# Altium PCB DB42.PcbDoc (part 6 of 8)
Units mil, origin at the board's own origin, x right, y up, seen from the top; angles counter-clockwise.
Board outline 3236.22 x 4456.69 mil, 8 copper layers (Top Layer, MidLayer1, MidLayer2, GND-Layer5, MidLayer3, VCC, MidLayer4, Bottom Layer), stack 62.194 mil thick; 214 components, 470 nets, 1802 pads, 1663 vias.
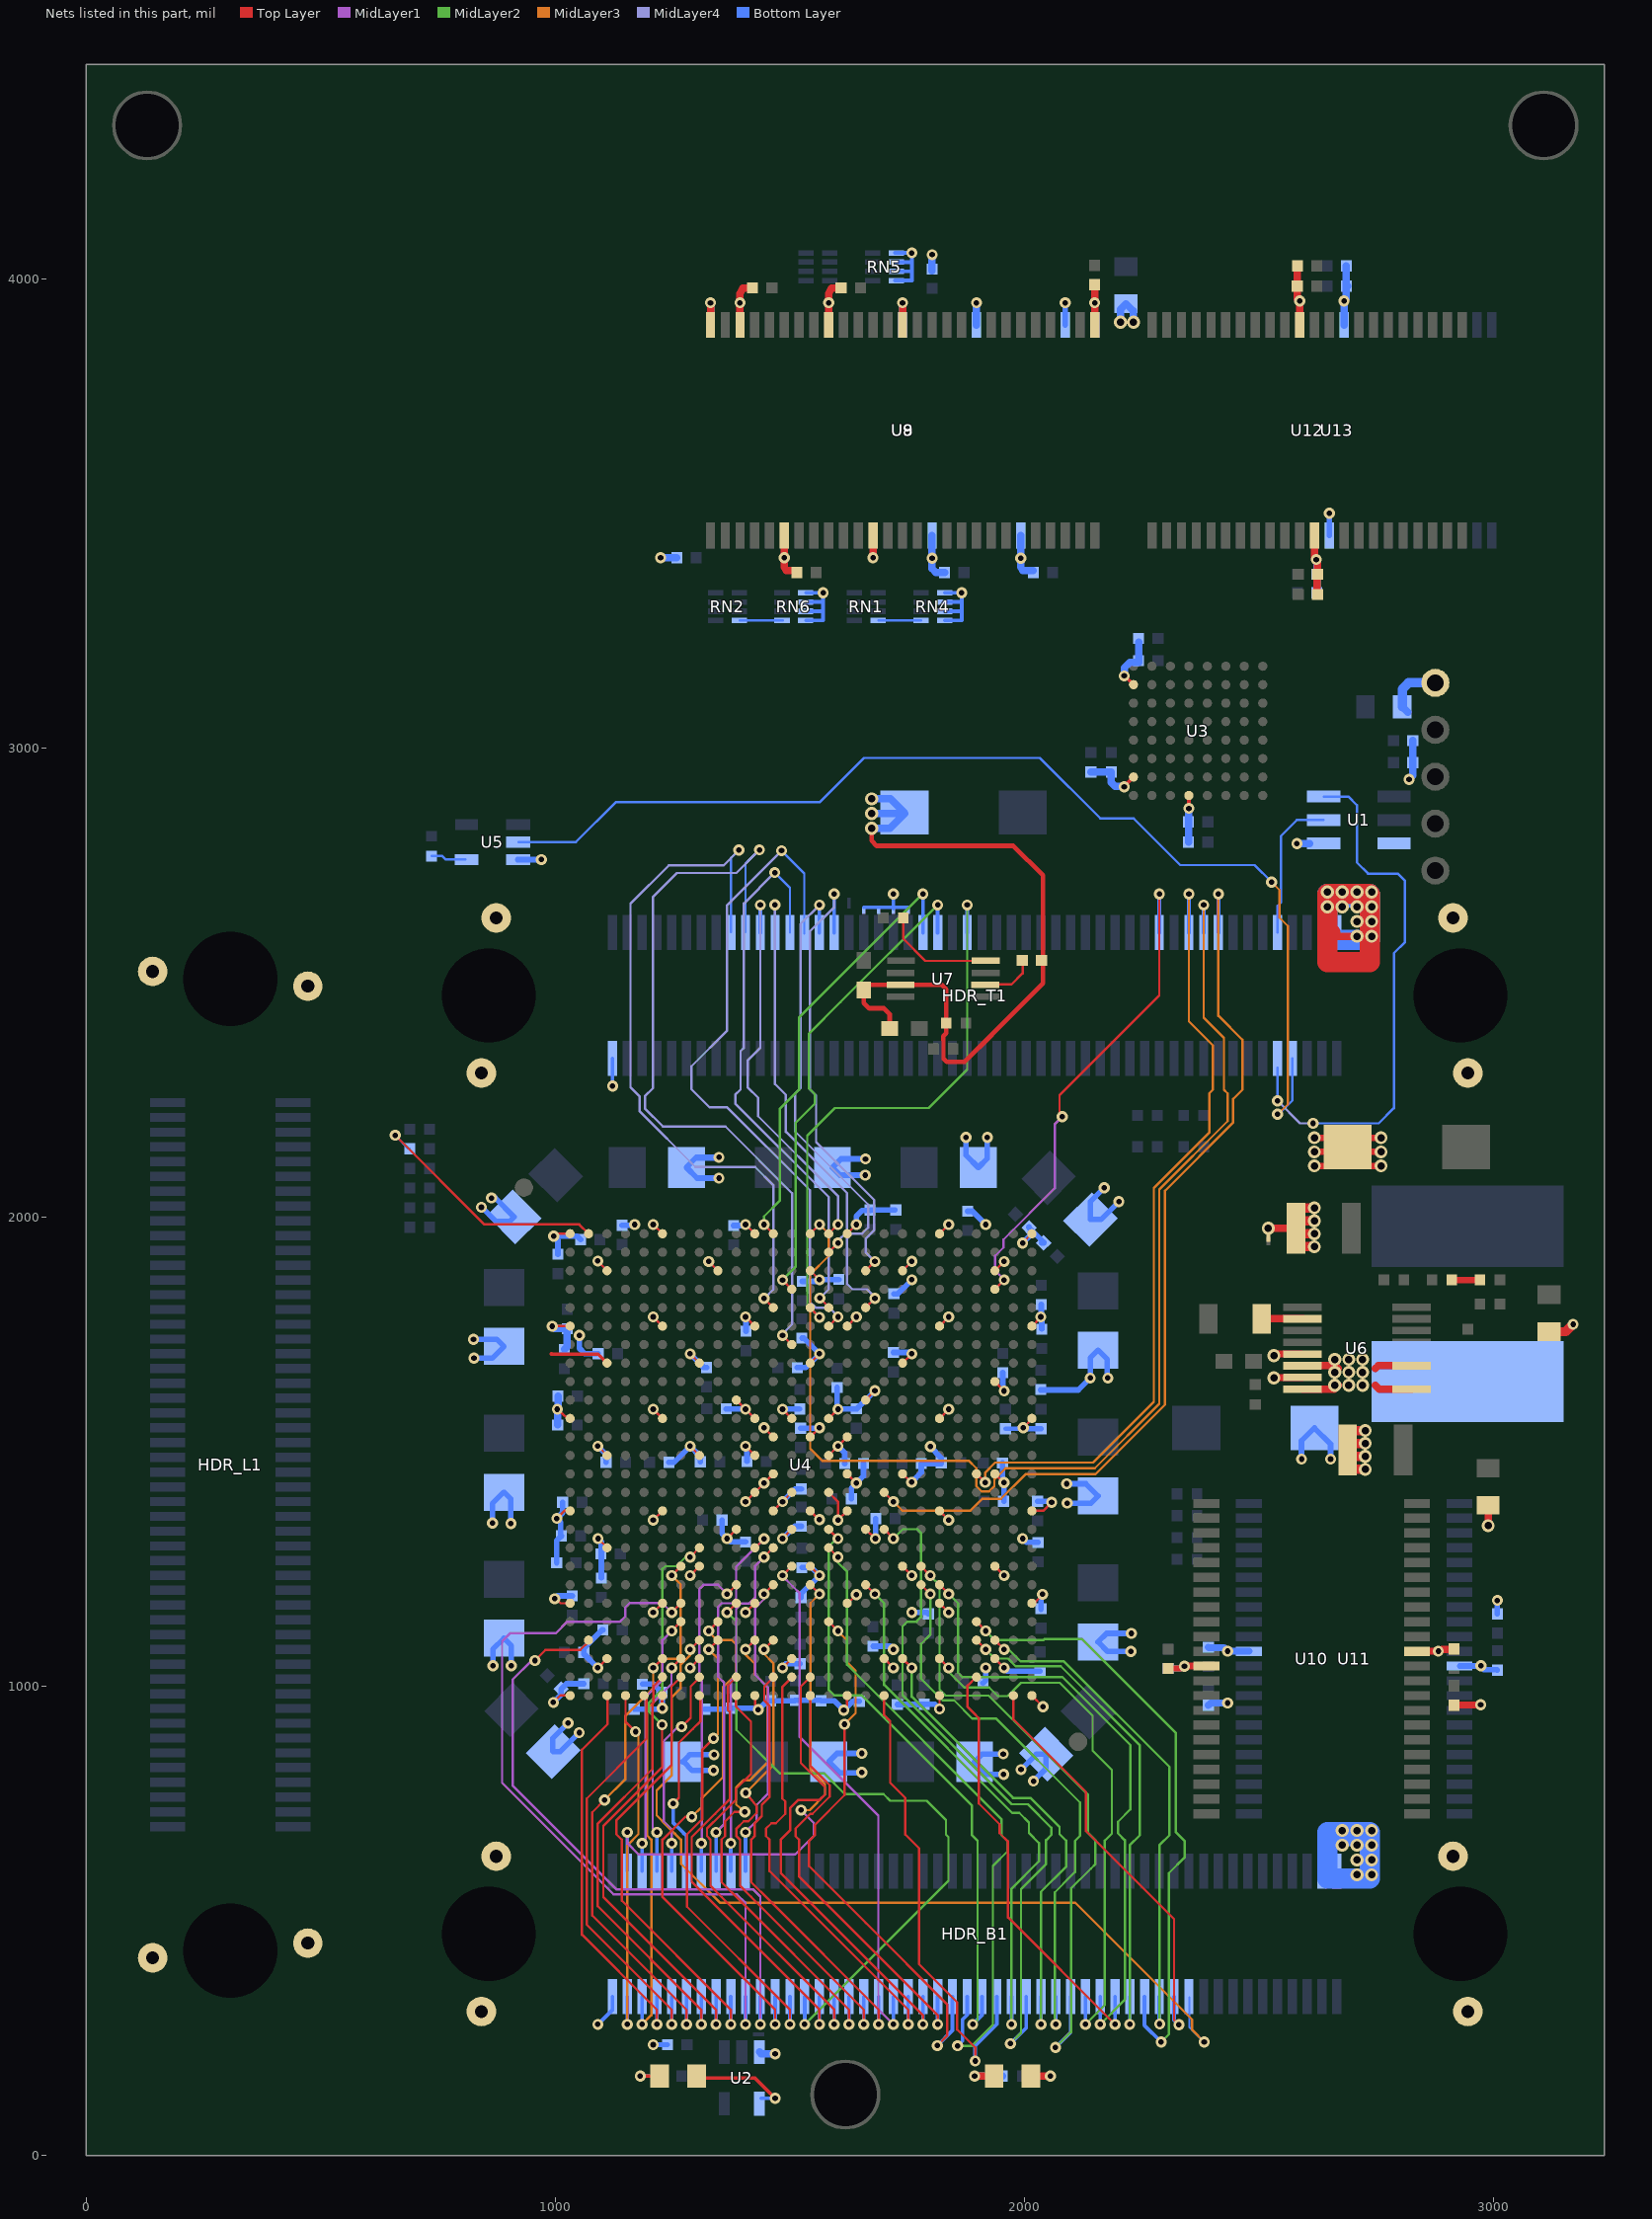
[diagram p12: the nets of this part, all layers, seen from the top]

## Via types
v1: diameter 23.62, hole 11.81, Top Layer to Bottom Layer, 1081 vias
v2: diameter 23.62, hole 11.81, Top Layer to Bottom Layer, tented both sides, 466 vias
v3: diameter 27.56, hole 15.75, Top Layer to Bottom Layer, 116 vias

## Nets (pads, with @x,y where several pads share a name; then routed paths per layer and width w, separated by ;. In a path a pad name is that pad's centre, name@x,y a point inside that pad or via, vN(x,y) a via of type N, cw(c..) or ccw(c..) an arc to the next point about the centre after c; other vN are vias at no path point) (continued)
GND: C1.1 C2.2 C3.2 C4.2 C5.2 C6.2 C7.2 C8.2 C9.2 C10.2 C11.2 C12.2 C13.2 C14.2 C15.2 C16.2 C17.2 C18.2 C19.2 C20.2 C21.2 C22.2 C23.2 C24.2 C25.2 C26.2 C27.2 C28.2 C29.2 C30.2 C31.2 C32.2 C33.2 C34.2 C35.2 C36.2 C37.2 C38.2 C39.2 C40.2 C41.2 C42.2 C43.2 C44.2 C45.2 C46.2 C47.2 C48.2 C49.2 C50.2 C51.2 C52.2 C53.2 C54.2 C55.2 C56.2 C57.2 C58.2 C59.2 C60.2 C61.2 C62.2 C63.2 C64.2 C65.2 C66.2 C67.2 C68.2 C69.2 C70.2 C71.2 C72.2 C73.2 C74.2 C75.2 C76.2 C77.2 C78.2 C79.2 C80.2 C81.2 C82.2 C83.2 C84.2 C85.2 C86.2 C87.2 C88.2 C89.2 C90.2 C91.2 C92.2 C93.2 C94.2 C95.2 C96.2 C97.2 C98.2 C99.2 C100.2 C101.1 C102.2 C103.2 C104.2 C105.2 C106.2 C107.2 C108.2 C109.2 C112.2 C113.2 C114.2 C115.2 C116.2 C118.2 C119.2 C120.2 C121.2 C122.2 C123.2 C124.2 C125.2 C126.2 C127.2 C128.2 C129.2 C130.2 C131.2 C132.2 C133.2 C134.2 C135.2 C136.2 C137.2 C138.2 C139.2 C140.2 C141.2 C142.2 C143.2 C144.2 HDR_B1.1 HDR_B1.98 HDR_B1.100 HDR_B1.MH1 HDR_B1.MH2 HDR_B1.MH3 HDR_B1.MH4 HDR_L1.MH1 HDR_L1.MH2 HDR_L1.MH3 HDR_L1.MH4 HDR_T1.1 HDR_T1.98 HDR_T1.100 HDR_T1.MH1 HDR_T1.MH2 HDR_T1.MH3 HDR_T1.MH4 LED2.2 NT2.2 NT3.2 NT4.2 NT5.2 NT8.2 R25.2 RN4.1 RN4.2 RN4.3 RN4.4 RN5.1 RN5.2 RN5.3 RN5.4 RN6.1 RN6.2 RN6.3 RN6.4 TP1.1 U1.1 U2.3 U3.E8 U3.H2 U3.H7 U4.A1 U4.A6 U4.A11 U4.A16 U4.A21 U4.A26 U4.AA1 U4.AA6 U4.AA11 U4.AA16 U4.AA21 U4.AA26 U4.AD3 U4.AD8 U4.AD13 U4.AD18 U4.AD24 U4.AF1 U4.AF6 U4.AF11 U4.AF16 U4.AF21 U4.AF26 U4.C3 U4.C9 U4.C14 U4.C19 U4.C24 U4.F1 U4.F6 U4.F11 U4.F16 U4.F21 U4.F26 U4.H3 U4.H8 U4.H14 U4.H19 U4.J24 U4.K10 U4.K17 U4.L1 U4.L6 U4.L11 U4.L13 U4.L15 U4.L21 U4.L26 U4.M12 U4.M14 U4.M16 U4.N3 U4.N8 U4.N11 U4.N15 U4.P12 U4.P16 U4.P19 U4.P24 U4.R11 U4.R13 U4.R15 U4.T1 U4.T6 U4.T12 U4.T14 U4.T16 U4.T21 U4.T26 U4.U10 U4.U13 U4.U17 U4.V3 U4.W8 U4.W14 U4.W19 U4.W24 U5.3 U6.13 U6.15 U7.3 U8.6 U8.12 U8.28 U8.41 U8.46 U8.52 U8.54 U9.6 U9.12 U9.28 U9.41 U9.46 U9.52 U9.54 U10.12 U10.34 U11.12 U11.34 U12.12 U12.34 U13.12 U13.34 | length 16704.6
  Top Layer w5: v1(993.19,1767.4) 992.87,1767.72 993.19,1767.72 U4.F1@1031.5,1767.72 ; v1(995.87,965.71) 1011.18,981.02 1031.5,981.02 U4.AF1@1034.8,981.02 ; v1(996.69,1959.45) 1001.81,1964.57 U4.A1@1031.5,1964.57 ; v1@999.29,1189.13 1000.24,1188.18 1011.26,1177.17 U4.AA1@1031.5,1177.17 ; v1(1003.15,1357.87) 1019.29,1374.02 U4.T1@1031.5,1374.02 ; v1(1004.33,1590.55) 1025.31,1571.85 1025.31,1570.87 1025.31,1569.88 U4.L1@1026.3,1570.87 ; v1(1090.55,1039.37) U4.AD3@1110.24,1059.05 ; v1(1090.55,1511.81) U4.N3@1110.24,1492.13 ; v1(1090.59,1906.57) U4.C3@1110.24,1885.83 ; v1(1090.94,1314.96) 1110.24,1295.67 U4.V3@1110.24,1295.28 ; U4.H3@1108.72,1689.87 U4.H3@1109.11,1689.87 ; v1(1208.66,1157.48) U4.AA6@1228.35,1177.17 ; v1(1208.66,1354.33) U4.T6@1228.35,1374.02 ; v1(1208.66,1590.55) U4.L6@1228.35,1570.87 ; v1(1208.66,1787.4) U4.F6@1228.35,1767.72 ; v1(1208.66,1984.25) U4.A6@1228.35,1964.57 ; v1@1226.77,954.33 U4.AF6@1226.77,979.13 ; v1(1227.87,953.54) U4.AF6@1227.87,977.91 ; v1(1287.4,1039.37) U4.AD8@1307.09,1059.05 ; v1(1287.4,1236.22) U4.W8@1307.09,1255.91 ; v1(1287.4,1511.81) U4.N8@1307.09,1492.13 ; v1(1287.4,1708.66) U4.H8@1307.09,1688.98 ; v1(1326.77,1905.51) U4.C9@1346.46,1885.83 ; v1(1366.14,1314.96) U4.U10@1385.83,1334.65 ; U4.K10@1386.61,1610.63 1386.61,1610.24 1386.61,1609.45 v1(1405.51,1590.55) U4.L11@1425.2,1570.87 ; v1(1405.51,1157.48) U4.AA11@1425.2,1177.17 ; v1(1405.51,1393.7) U4.R11@1425.2,1413.39 v1(1444.88,1433.07) U4.P12@1464.57,1452.76 ; v1(1405.51,1511.81) U4.N11@1425.2,1492.13 ; v1(1405.51,1787.4) U4.F11@1425.2,1767.72 ; v1(1405.51,1984.25) U4.A11@1425.2,1964.57 ; U4.AF11@1425.91,979.96 1425.91,957.17 v1(1432.64,950.43) ; v1(1444.88,1551.18) U4.M12@1464.57,1531.5 ; U4.T12@1464.57,1374.02 v1(1484.25,1393.7) U4.R13@1503.94,1413.39 ; v1(1484.25,1039.37) U4.AD13@1503.94,1059.05 ; v1(1484.25,1314.96) U4.U13@1503.94,1334.65 1504.33,1335.04 U4.U13@1505.12,1335.04 ; v1(1484.25,1590.55) U4.L13@1503.94,1570.87 ; U4.W14@1543.31,1255.91 v1(1562.99,1236.22) ; U4.T14@1543.31,1374.02 1562.4,1354.92 v1@1562.99,1354.33 ; U4.M14@1543.31,1531.5 v1(1562.99,1551.18) ; U4.H14@1543.31,1688.98 v1(1562.99,1708.66) ; U4.C14@1543.31,1885.83 1543.7,1885.83 v1(1562.99,1866.54) ; U4.L15@1577.01,1569.88 U4.L15@1580.33,1573.21 ; U4.R15@1582.68,1413.39 1602.36,1393.7 v1(1602.36,1354.33) U4.T16@1622.05,1374.02 ; U4.N15@1582.68,1492.13 v1(1602.36,1511.81) U4.M16@1622.05,1531.5 ; U4.L15@1582.68,1570.87 v1(1602.36,1590.55) ; v1(1614.84,949.37) 1622.05,956.57 U4.AF16@1622.05,980.31 ; U4.AA16@1622.05,1177.17 1623.62,1177.16 v1(1641.73,1195.28) ; U4.P16@1622.05,1452.76 v1(1641.73,1433.07) ; U4.F16@1622.05,1767.72 v1(1641.73,1787.4) ; U4.A16@1622.05,1964.57 v1(1641.73,1984.25) ; U4.U17@1661.42,1334.65 v1(1682.28,1314.96) ; U4.K17@1661.42,1610.24 v1(1681.1,1629.92) ; U4.AD18@1700.79,1059.05 v1(1720.47,1039.37) ; U4.W19@1740.16,1255.91 v1(1759.84,1236.22) ; U4.P19@1740.16,1452.76 v1(1759.45,1435.04) ; U4.H19@1740.16,1688.98 v1(1759.84,1708.66) ; U4.C19@1740.16,1885.83 v1(1759.84,1905.91) ; U4.AF21@1818.9,980.31 1818.9,951.93 v1(1819.09,951.73) ; U4.AA21@1818.9,1177.17 v1(1838.58,1157.48) ; U4.T21@1818.9,1374.02 v1(1838.58,1354.33) ; U4.L21@1818.9,1570.87 v1(1838.58,1590.55) ; U4.F21@1818.9,1767.72 v1(1838.58,1787.4) ; U4.A21@1818.9,1964.57 v1(1838.58,1984.25) ; U4.AD24@1937.01,1059.05 v1(1956.69,1039.37) ; U4.W24@1937.01,1255.91 v1(1956.69,1236.22) ; U4.P24@1937.01,1452.76 1956.1,1434.05 v1@1956.3,1433.86 ; U4.J24@1937.01,1649.61 1937.01,1649.21 v1(1956.69,1629.53) ; U4.C24@1937.01,1885.83 v1(1956.69,1905.51) ; v1@1997.19,1946.36 2015.39,1964.57 U4.A26@2015.75,1964.57 U4.A26@2016.54,1964.57 ; v1(1997.24,1551.18) 2015.75,1569.69 U4.L26@2015.75,1570.87 ; U4.AF26@2015.75,980.31 v1(2039.41,956.65) ; U4.AA26@2015.75,1177.17 2020.47,1177.17 v1@2037.8,1194.49 ; U4.T26@2015.75,1374.02 2039.76,1374.02 v1(2057.87,1392.13) ; U4.F26@2015.75,1767.72 2016.14,1767.72 v1@2032.68,1784.25
  Top Layer w7.87: v1@2212.6,2918.31 U3.H7@2232.28,2937.99 ; v1@2212.6,3154.53 2213.09,3154.04 U3.H2@2232.28,3134.84 ; v1(2350.4,2871.07) U3.E8@2350.39,2898.62
  Top Layer w8: 992.13,1708.66 992.97,1707.82 1091.39,1707.82 U4.H3@1110.24,1688.98 ; 1826.77,2377.95 1827.63,2377.09 1827.63,2337.72 1830.71,2334.65 ; 1875.2,2331.89 1930.31,2387
  Top Layer w10: C119.2@1657.48,2484.25 1657.48,2456.7 1669.29,2444.88 1700.79,2444.88 1712.59,2433.07 C118.2@1712.59,2409.44 ; C119.2@1657.48,2495.07 U7.3@1736.22,2495.07 1823.82,2495.07 1833.15,2485.75 R25.2@1833.15,2413.38 1833.15,2392.2 1826.77,2385.83 1826.77,2377.95 ; v3(1674.21,2828.74) 1674.21,2802.16 1685.04,2791.33 1976.37,2791.33 2039.37,2728.34 2039.37,2547.24 2039.37,2498.03 2016.63,2475.29 ; 1828.68,2336.67 1834.25,2331.1 1872.44,2331.1 2036.41,2495.07
  Top Layer w12: C130.2@2306.5,1038.11 2336.11,1038.11 v1(2341,1043)
  Top Layer w13.78: v3(2618.11,2109.29) C99.2@2669.08,2109.29 ; v3(2618.11,2139.29) C99.2@2669.08,2139.29 ; v3(2618.11,2169.29) C99.2@2669.08,2169.29 ; C99.2@2709.01,2109.29 v3(2759.99,2109.29) ; C99.2@2709.01,2139.29 v3(2759.99,2139.29) ; C99.2@2709.01,2169.29 v3(2759.99,2169.29)
  Top Layer w15: v1@2341,1041.79 v1(2341,1043) 2341.3,1043.3 U10.34@2387.89,1043.3 ; v3(2531.5,1657.48) 2532.26,1658.25 U6.15@2591.08,1658.25 ; v3(2531.5,1704.72) 2535.43,1708.66 U6.13@2590.55,1708.66 ; U10.12@2836.71,1074.8 2881.8,1074.8 v1(2882,1075) 2886.02,1075 2889.76,1078.74 2914.47,1078.74 C129.2@2915.44,1079.71 ; C131.2@2915.31,957.92 2917.32,957.76 C131.2@2915.44,959.64 2914.45,960.63 2915.44,960.63 v1(2972.44,960.63)
  Top Layer w15.75: U8.54@1330.71,3901.57 v2(1330.71,3948.82) ; U8.52@1393.7,3901.57 v2(1393.7,3948.82) ; v2@1393.7,3944.88 v2(1393.7,3948.82) ; 1393.7,3964.57 v2(1393.7,3948.82) ; 1393.7,3968.51 1399.61,3980.32 C125.2@1416.34,3980.32 ; C125.2@1418.31,3978.34 C125.2@1416.34,3980.32 ; C125.2@1420.27,3980.31 C125.2@1416.34,3980.32 ; U8.6@1488.19,3452.76 1488.19,3409.45 v2(1488.19,3405.51) 1488.19,3385.83 1492.13,3377.95 C122.2@1514.76,3377.95 ; U8.46@1582.68,3901.57 v2(1582.68,3948.82) ; v2@1582.68,3944.88 v2(1582.68,3948.82) ; C126.2@1609.25,3980.31 1588.58,3980.32 1582.68,3968.51 1582.68,3964.57 v2(1582.68,3948.82) ; v2(1677.17,3405.51) U8.12@1677.17,3452.76 ; U8.41@1740.16,3901.57 v2(1740.16,3948.82) ; LED2.2@2011.81,169.29 LED2.2@2013.78,169.29 v1(2055.12,169.29) ; U8.28@2149.61,3901.57 v2(2149.61,3948.82) C121.2@2149.6,3987.2 ; v3(2519.68,1976.38) 2578.74,1976.38 C116.2@2582.67,1976.38 ; C138.2@2580.43,4028.54 C138.2@2580.57,4028.67 ; C138.2@2581.69,4027.55 2581.69,3984.24 2581.69,3957.68 v2(2586.61,3952.76) U12.34@2586.61,3901.57 ; U12.12@2618.11,3452.76 2618.11,3405.51 v2(2622.05,3401.57) 2624.72,3398.9 C141.2@2624.72,3370.07 C141.2@2625.71,3371.06 ; C137.2@2623.74,3329.72 2623.74,3370.07 C141.2@2623.77,3370.23 ; 2645.67,2598.43 v3(2708.66,2598.43) ; v3(2988.19,1342.52) C113.2@2988.18,1385.82
  Top Layer w19.68: C115.2@3118.1,1755.9 3153.54,1755.9 v1(3169.29,1771.65)
  Top Layer w20: C116.2@2578.74,1937 v3(2618.1,1937) ; C116.2@2578.74,1964.56 v3(2618.1,1964.56) ; C116.2@2578.74,1992.12 v3(2618.1,1992.12) ; C116.2@2578.74,2019.68 v3(2618.1,2019.68) ; C114.2@2687.01,1462.59 2688.97,1462.59 v3(2726.38,1462.59) ; C114.2@2687.01,1490.15 2688.97,1490.15 v3(2726.38,1490.15) ; C114.2@2687.01,1517.71 2688.97,1517.71 v3(2726.38,1517.71) ; C114.2@2687.01,1545.27 2688.97,1545.27 v3(2726.38,1545.27)
  Top Layer w39.37: 2645.67,2606.3 2653.54,2606.3
  Top Layer w43.31: 2645.67,2543.31 2736.22,2543.31 2736.22,2598.43 2736.22,2629.92 2736.22,2661.42 2736.22,2688.98 2708.66,2688.98 2677.17,2688.98 2645.67,2688.98 v3(2645.67,2661.42) 2645.67,2606.3 2645.67,2598.43 2645.67,2543.31
  Bottom Layer w5: v1@1003.15,1350.39 v1(1003.15,1357.87) ; v1@1223.23,958.66 1227.56,954.33 1228.11,953.78 v1@1228.74,953.15
  Bottom Layer w7.87: v2(1090.55,279.53) 1122.05,311.02 HDR_B1.1@1122.05,338.58 ; v2(1122.05,2279.53) HDR_T1.1@1122.05,2338.58 ; RN6.4@1534.64,3271.65 1570.87,3271.65 1570.87,3291.34 ; RN6.3@1534.64,3291.34 1570.87,3291.34 ; RN6.2@1534.64,3311.02 1570.87,3311.02 ; RN6.1@1534.64,3330.71 v1(1570.87,3330.71) 1570.87,3311.02 ; NT5.2@1657.48,2660.43 1688.97,2660.43 NT3.2@1720.47,2660.43 ; NT3.2@1720.47,2657.48 NT3.2@1720.47,2660.43 ; v2(1720.47,2688.98) NT3.2@1720.47,2660.43 ; RN5.4@1723.62,3996.06 RN5.4@1726.58,3996.06 1759.84,3996.06 1759.84,4015.75 ; RN5.3@1723.62,4015.75 RN5.3@1726.58,4015.75 1759.84,4015.75 ; RN5.2@1723.62,4035.43 RN5.2@1726.58,4035.43 1759.84,4035.43 ; RN5.1@1723.62,4055.12 RN5.1@1726.58,4055.12 v1(1759.84,4055.12) 1759.84,4035.43 ; NT2.2@1751.96,2660.43 NT3.2@1720.47,2660.43 ; RN4.4@1829.93,3271.65 1866.14,3271.65 1866.14,3291.34 ; RN4.3@1829.93,3291.33 1866.14,3291.34 ; RN4.2@1829.93,3311.02 1866.14,3311.02 ; RN4.1@1829.93,3330.7 v1(1866.14,3330.71) 1866.14,3311.02 ; 1570.87,3291.34 1570.87,3311.02 ; 1759.84,4015.75 1759.84,4035.43 ; 1866.14,3291.34 1866.14,3311.02
  Bottom Layer w9.84: v1(1208.66,236.22) C101.1@1239.17,236.22
  Bottom Layer w10: C75.2@1959.65,1549.21 1994.88,1549.21 v1@1996.06,1550.39
  Bottom Layer w11.81: v1(825.58,1739.71) 875.11,1739.71 C10.2@890.44,1724.38 865.43,1699.37 v1(826.56,1699.37) ; v1(865.92,1348.08) 865.92,1389.41 889.95,1413.44 C42.2@890.44,1413.44 891.09,1413.44 905.28,1399.25 v1(905.28,1347.1) ; v1(866.9,1044.02) 866.9,1078.91 C8.2@890.44,1102.45 906.26,1086.63 v1(906.26,1044.02) ; C20.2@994.82,861.98 994.82,889.54 v1(1027.3,922.01) ; C20.2@995.54,860.94 1010.51,860.94 v1(1050.91,901.34) ; v1(1004.33,1590.55) v1@1004.92,1591.14 ; v1(1090.55,1511.81) 1108.27,1494.09 C44.2@1108.27,1477.36 ; v1@1227.56,954.33 C66.2@1227.56,986.61 ; C46.2@1242.13,1477.36 1252.95,1477.36 v1(1287.4,1511.81) 1309.06,1490.16 C30.2@1309.06,1478.35 ; C9.2@1271.74,839.26 C9.2@1272.59,840.11 ; v1(1337.26,820.66) 1292.05,820.66 C9.2@1272.59,840.11 ; v1(1338.24,854.11) 1286.59,854.11 C9.2@1272.59,840.11 ; C71.2@1355.31,1354.33 1355.31,1325.79 v1(1366.14,1314.96) 1373.42,1307.68 C49.2@1405.51,1307.68 ; C77.2@1364.17,1591.54 1404.53,1591.54 v1(1405.51,1590.55) ; v1@1405.12,1512.99 1405.9,1512.21 v1@1406.5,1511.61 ; v1(1405.51,1511.81) 1408.46,1508.86 C17.2@1408.46,1479.33 ; v1(1405.51,1787.4) 1406.5,1786.42 C78.2@1406.5,1756.89 ; v1@1483.07,1039.76 1483.46,1040.16 1491.54,1048.23 C52.2@1521.65,1048.23 ; v1(1484.25,1393.7) v1@1485.24,1394.68 ; C45.2@1515.75,1679.13 1533.46,1679.13 v1(1562.99,1708.66) 1529.53,1742.13 C51.2@1525.59,1742.13 ; C15.2@1522.64,1550.2 1562.01,1550.2 v1(1562.99,1551.18) ; C53.2@1523.62,1188.98 1523.62,1196.85 v1(1562.99,1236.22) 1546.26,1252.95 C27.2@1525.59,1252.95 ; v1@1559.65,1863.19 v1(1562.99,1866.54) v1@1563.58,1867.13 ; v1@1599.41,1508.86 v1(1602.36,1511.81) ; C70.2@1600.39,1636.81 1600.39,1594.09 v1@1602.95,1591.54 ; v1@1601.57,1590.16 1602.17,1590.75 v1@1602.95,1591.54 ; v1@1603.15,1591.34 v1@1602.95,1591.54 ; C12.2@1630.91,1399.61 1630.91,1422.24 v1(1641.73,1433.07) ; v1(1641.73,1984.25) 1641.73,2001.88 1654.1,2014.25 1669.84,2014.25 C96.2@1670.83,2015.24 ; v1(1653.12,816.72) 1652.14,815.74 1606.25,815.74 C39.2@1582.72,839.26 1600.52,857.06 v1(1653.12,857.06) ; v1(1681.1,1629.92) 1642.72,1591.54 C18.2@1641.73,1591.54 v1@1602.95,1591.54 ; v1(1682.28,1314.96) 1683.07,1316.93 C76.2@1683.07,1357.28 ; C86.2@1786.42,961.61 1809.21,961.61 v1(1819.09,951.73) ; v1(1799.61,1511.02) 1822.83,1486.61 C50.2@1822.83,1476.38 ; v1(1875.5,2169.72) 1875.5,2131.76 C5.2@1901.55,2105.71 1920.77,2124.93 v1(1920.77,2169.72) ; v1(1954.72,855.91) 1910.31,855.91 C7.2@1893.67,839.26 1920.34,812.6 v1(1955.51,812.6) ; v1@1955.82,1432.98 1956.6,1432.19 1956.6,1394.33 C28.2@1956.6,1393.97 ; v1(1956.3,1434.25) v1@1958.07,1436.02 ; v1(1992.6,822.62) 2025.35,855.37 C19.2@2046.14,855.37 2046.14,825 v1(2019.17,798.02) ; v1@1998.03,1549.61 1998.42,1549.21 C67.2@2035.43,1549.21 ; v1@2034.25,1788.98 2034.45,1788.78 v1@2034.45,1787.4 ; C89.2@2035.43,1164.37 C89.2@2035.43,1165.35 2035.43,1192.13 v1@2038.58,1195.28 ; v1@2038.19,1197.64 2039.07,1196.75 v1@2042.52,1193.31 ; U9.52@2086.61,3901.57 v2(2086.61,3948.82) ; v1(2090.02,1431.72) 2130.74,1431.72 C40.2@2156.9,1405.56 2141.73,1390.39 v1(2091,1390.39) ; v1(2140.2,1657.06) 2140.2,1699.84 C3.2@2156.88,1716.52 2176.61,1696.79 v1@2176.61,1658.04 ; U9.54@2149.61,3901.57 v2(2149.61,3948.82) ; v1(2169.72,2062.46) 2140.79,2033.53 C21.2@2140.79,1994.88 2163.14,1994.88 v1(2201.21,2032.94) ; v1(2226.79,1074.53) 2176.94,1074.53 C4.2@2156.9,1094.57 2175.23,1112.9 v1(2227.78,1112.9) ; U13.12@2649.61,3452.76 v2(2649.61,3500) ; U11.34@2927.25,1043.3 v1@2972.3,1043.3 ; v1(2973,1044) v1@2972.3,1043.3 ; C136.2@3007.87,1034.44 3006.88,1035.43 2979.33,1035.43 2972.3,1042.47 v1@2972.3,1043.3 ; C134.2@3007.87,1154.52 v1(3007.87,1183.07)
  Bottom Layer w12: v2(842.3,2021.14) 843.29,2021.14 873.79,1990.63 902.21,1990.63 C22.2@912.02,2000.45 871.65,2040.82 v2(863.95,2040.82) ; U5.3@920.04,2762.09 v1(970.22,2762.09) ; v1(995.87,965.71) 1012.39,982.23 C35.2@1012.39,993.98 1024.05,1005.65 C92.2@1060.75,1005.65 ; v1(998.79,1186.73) 1004.68,1192.61 C60.2@1036.15,1192.61 ; C98.2@1002.69,1263.46 1002.69,1310.76 C57.2@1012.8,1320.87 C57.2@1013.51,1320.15 ; C65.2@1005.65,1920.77 1005.65,1950.49 v1(996.69,1959.45) 1046.67,1959.45 C14.2@1053.86,1952.26 ; C57.2@1011.79,1320.29 1011.4,1320.69 1011.4,1320.87 1011.4,1349.63 v1(1003.15,1357.87) 1015.48,1370.21 C69.2@1015.48,1392.36 ; v1(1051.18,1748.03) 1051.18,1720.47 1062.45,1709.21 C94.2@1091.25,1709.21 C94.2@1089.77,1709.21 ; v1(1090.55,1039.37) 1060.76,1069.16 C83.2@1060.76,1072.56 1060.76,1081.21 1099.63,1120.08 C25.2@1101.38,1120.08 ; v1(1090.94,1314.96) 1098.14,1307.76 1098.14,1282.15 C73.2@1098.14,1230.99 ; C63.2@1142.42,1982.77 v1@1166.04,1982.76 ; C32.2@1168.01,951.53 1224.76,951.53 1227.32,954.09 v1@1227.56,954.33 ; C84.2@1185.73,1004.66 1209.51,1004.66 C66.2@1226.97,987.2 C66.2@1227.56,986.61 ; v1(1287.4,1708.66) 1316.37,1679.69 C48.2@1322.5,1679.69 ; C91.2@1318.56,951.52 1372.68,951.52 C90.2@1374.65,953.49 1429.58,953.49 v1(1432.64,950.43) 1451.44,969.23 C47.2@1459.27,969.23 1510.44,969.23 C82.2@1511.42,970.22 1565.54,970.22 C61.2@1566.53,969.23 1594.98,969.23 v1(1614.84,949.37) 1633.72,968.25 C80.2@1648.2,968.25 ; v1(1348.82,2083.07) 1302.26,2083.07 C6.2@1279.61,2105.72 1279.62,2106.39 C6.2@1299.21,2125.98 ; C97.2@1379.92,1982.28 1403.54,1982.28 v1(1405.51,1984.25) ; v1(1484.25,1314.96) 1510.48,1341.19 C16.2@1524.22,1341.19 ; v1(1484.25,1393.7) 1511.44,1420.89 C13.2@1524.22,1420.89 ; v1(1484.25,1590.55) 1484.83,1591.13 C37.2@1520.28,1591.13 ; C79.2@1526.57,1863.19 1559.65,1863.19 v1(1562.99,1866.54) ; v1@1562.99,1866.14 v1(1562.99,1866.54) ; v1(1602.36,1511.81) 1616.72,1497.46 C11.2@1616.72,1475.02 ; C41.2@1603.54,2092.52 1590.58,2105.48 C41.2@1590.58,2105.71 C41.2@1590.75,2105.71 ; C26.2@1604.33,1867.13 v1@1563.58,1867.13 ; v1@1642.3,1433.69 1657.05,1448.44 C29.2@1657.05,1475.02 ; v1@1657.48,2092.52 v1(1660.63,2089.37) 1607.09,2089.37 C41.2@1590.75,2105.71 ; v1(1661.02,2124.02) 1609.06,2124.02 C41.2@1590.75,2105.71 ; C96.2@1671.31,2014.76 C96.2@1670.83,2015.24 C81.2@1723.96,2015.24 ; C33.2@1677.17,1085.63 1713.58,1085.63 v1(1720.47,1078.74) ; C24.2@1720.47,1711.61 1756.89,1711.61 v1(1759.84,1708.66) ; C56.2@1721.46,1836.61 1729.92,1836.61 v1(1759.84,1866.54) ; C95.2@1728.89,961.36 1786.17,961.36 C86.2@1786.42,961.61 ; v1(1759.45,1435.04) 1780.06,1455.65 C23.2@1780.06,1475.02 C50.2@1822.37,1475.02 ; v1(1759.84,1157.48) 1792.32,1157.48 C54.2@1795.28,1154.53 ; C64.2@1878.94,2012.8 1888.78,2012.8 v1(1917.32,1984.25) ; C55.2@1911.42,1006.89 1917.32,1012.8 v1(1917.32,1039.37) ; C43.2@1953.25,1476 1953.25,1437.31 v1(1956.3,1434.25) ; C34.2@1953.74,1668.31 1953.74,1632.48 v1(1956.69,1629.53) ; v1(1956.69,1039.37) 1963.85,1032.21 C93.2@2032.94,1032.21 ; v1(1996.06,1314.96) 2004.27,1306.76 C38.2@2029.01,1306.76 ; v1(1996.06,1944.88) 2015.75,1964.57 ; C31.2@2008.84,1978.33 C31.2@2009.33,1978.82 ; C31.2@2010.17,1977 2040.96,1946.21 C74.2@2040.96,1945.22 C74.2@2037.02,1945.22 ; C88.2@2028.02,1394.33 2055.67,1394.33 v1(2057.87,1392.13) ; C58.2@2033.93,1631.47 2034.91,1631.47 2114.62,1631.47 v1(2140.2,1657.06) ; C87.2@2035.9,1813.51 2035.9,1788.65 v1(2034.65,1787.4) ; C36.2@2036.88,1761.37 2036.88,1785.17 v1(2034.65,1787.4) ; v1@2039.37,1787.4 v1(2034.65,1787.4) ; C132.2@2306.5,1038.11 2336.11,1038.11 v1(2341,1043) ; v1(2590.55,1484.25) 2590.55,1523.43 C112.2@2618.04,1550.91 2652.34,1516.61 v1(2652.34,1484.25) ; C6.2@1299.21,2125.98 1300.79,2127.56 v1(1348.82,2127.56) 1347.24,2125.98 C6.2@1299.21,2125.98 ; v1(1562.99,1866.54) v1@1563.58,1867.13 ; v1(1562.99,1866.54) v1@1563.58,1867.13
  Bottom Layer w15: C133.2@2391.82,959.64 2396.75,964.57 v1(2433.07,964.57) ; C135.2@2391.82,1083.65 2392.8,1082.68 2425.2,1082.68 2432.87,1075 v1(2433,1075) 2433.21,1074.79 U11.12@2478.44,1074.79
  Bottom Layer w15.75: v1(993.19,1767.4) 998.25,1762.34 C85.2@1025.33,1762.34 1025.33,1723.97 C68.2@1019.42,1718.07 ; C62.2@1004.92,1557.09 1004.92,1590.55 1004.92,1592.24 1005.64,1592.97 C72.2@1005.64,1618.68 ; v2(1224.41,3405.51) C123.2@1258.85,3405.51 ; U9.28@1330.71,3901.57 v2@1330.71,3944.88 ; U2.3@1435.04,220.47 1438.97,216.54 v1(1468.5,216.54) ; v3(1674.21,2828.74) 1713.39,2828.74 C100.2@1744.88,2860.24 ; v3(1674.21,2860.24) 1744.17,2860.24 C100.2@1744.88,2860.24 ; v3(1674.21,2891.73) 1713.93,2891.73 1743.68,2861.98 1745.15,2860.51 C100.2@1744.88,2860.24 ; U9.41@1740.16,3901.57 v2(1740.16,3948.82) ; U9.12@1803.15,3452.76 1803.15,3405.51 v2(1803.15,3404.53) 1803.15,3381.89 1811.04,3374.01 C128.2@1829.72,3374.01 ; C124.2@1803.15,4016.72 C124.2@1803.15,4020.66 1803.15,4047.24 v2(1803.15,4051.18) ; U9.46@1897.64,3901.57 v2(1897.64,3948.82) v2@1897.64,3944.88 ; U9.6@1992.13,3452.76 v2(1992.13,3404.53) 1992.13,3385.83 1996.06,3377.95 C127.2@2018.7,3377.95 ; C107.2@2141.73,2948.82 C104.2@2185.04,2948.82 2185.04,2926.19 2192.92,2918.31 v1@2212.6,2918.31 ; v3(2204.72,3907.48) 2204.72,3935.04 C109.2@2216.53,3946.84 2232.28,3931.1 v3(2232.28,3907.48) ; v1(2212.6,3153.54) 2212.6,3170.28 2224.41,3182.09 2243.1,3182.09 C106.2@2243.11,3186.02 C103.2@2243.11,3225.39 ; C102.2@2349.41,2799.21 2350.4,2800.2 2350.4,2842.52 v1(2350.4,2871.07) ; v2(2580.71,2796.26) 2608.06,2796.26 U1.1@2608.25,2796.45 ; v2(2622.05,3401.57) 2623.03,3400.6 C143.2@2623.03,3370.07 C139.2@2623.03,3330.7 ; v2@2681.1,3956.7 v2(2681.1,3952.76) 2686.02,3957.67 C144.2@2686.02,3984.24 ; U13.34@2681.38,3901.57 v2@2681.38,3944.88 ; C140.2@2686.02,4027.56 2686.02,3987.2 2687.5,3985.72 C144.2@2688.98,3984.25 ; C108.2@2805.13,3087.59 C108.2@2816.93,3075.79 ; v1(2819.68,2933.07) 2827.75,2941.14 C2.2@2827.75,2968.5 C1.1@2827.75,3015.74
  Bottom Layer w20: C108.2@2805.13,3087.59 2805.12,3125.12 2818.67,3138.67 TP1.1@2875.71,3138.67
  Bottom Layer w43.31: 2649.61,681.1 2677.17,681.1 2708.66,681.1 v3@2736.22,681.1 ; v3@2649.61,2681.1 2677.17,2681.1 2708.66,2681.1 v3@2736.22,2681.1 ; v3@2736.22,681.1 2736.22,688.98 2708.66,688.98 2677.17,688.98 2645.67,688.98 2645.67,661.42 2645.67,606.3 2645.67,590.55 2665.36,590.55 2708.66,590.55 2736.22,590.55 2736.22,598.42 2736.22,629.92 2736.22,661.42 v3@2736.22,681.1 ; v3@2736.22,2681.1 2736.22,2688.98 2708.66,2688.98 2677.17,2688.98 2645.67,2688.98 v3(2645.67,2661.42) 2645.67,2606.3 2645.67,2590.55 2665.36,2590.55 2708.66,2590.55 2736.22,2590.55 2736.22,2598.43 2736.22,2629.92 2736.22,2661.42 v3@2736.22,2681.1
  other v1: 2038.58,1196.26 1562.99,1355.51 2177.59,1657.06 1169.29,1984.25 2212.6,2917.32
  other v3: 2708.66,598.42 2740.16,598.42 2708.66,629.92 2740.16,629.92 2677.17,661.42 2708.66,661.42 2740.16,661.42 2677.17,692.91 2708.66,692.91 2740.16,692.91 2740.16,2598.43 2708.66,2629.92 2740.16,2629.92 2677.17,2661.42 2708.66,2661.42 2740.16,2661.42 2645.67,2692.91 2677.17,2692.91 2708.66,2692.91 2740.16,2692.91
IO0: HDR_B1.7 U4.AF3 | length 849
  Top Layer w5: U4.AF3@1110.75,979.66 1110.75,980.31 U4.AF3@1110.75,980.75 ; U4.AF3@1111.4,979.66 1111.4,919.52 1056.93,865.05 1056.93,470.63 1216.54,311.02 v2(1216.54,279.53)
  Bottom Layer w7.87: v2(1216.54,279.53) HDR_B1.7@1216.54,338.58
IO1: HDR_B1.9 U4.AF5 | length 888.5
  Top Layer w5: 1066.93,700 1066.93,492.13 1248.03,311.02 v2(1248.03,279.53) ; 1066.93,701.57 1066.93,760.91 1194.58,888.55 1194.58,974.91 U4.AF5@1189.13,980.35
  Bottom Layer w7.87: v2(1248.03,279.53) HDR_B1.9@1248.03,338.58
IO2: HDR_B1.11 U4.AD6 | length 983.7
  Top Layer w5: v1(1105.12,757.87) 1078.74,731.5 1078.74,511.81 1279.53,311.02 v2(1279.53,279.53) ; v1(1208.66,1039.37) U4.AD6@1228.35,1059.05
  MidLayer3 w5: v1(1105.12,757.87) 1148.8,801.55 1148.8,936.27 1208.66,996.13 v1(1208.66,1039.37)
  Bottom Layer w7.87: v2(1279.53,279.53) HDR_B1.11@1279.53,338.58
IO3: HDR_B1.13 U4.AE6 | length 947.6
  Top Layer w5: U4.AE6@1228.35,1019.68 1209.09,1000.43 1209.09,965 1207,962.91 1207,824 1090.55,707.55 1090.55,531.5 1311.02,311.02 v2(1311.02,279.53)
  Bottom Layer w7.87: v2(1311.02,279.53) HDR_B1.13@1311.02,338.58
IO4: HDR_B1.15 U4.V8 | length 1301.5
  Top Layer w5: v1(1227.56,918.11) 1227.56,827.56 1102.36,702.36 1102.36,551.18 1342.52,311.02 v2(1342.52,279.53) ; v1(1287.4,1275.59) U4.V8@1307.09,1295.28
  MidLayer2 w5: v1(1227.56,918.11) 1200,945.67 1200,965.35 1228.35,993.7 1228.35,1250 1234.25,1255.91 1257.87,1255.91 1277.56,1275.59 v1(1287.4,1275.59)
  Bottom Layer w7.87: v2(1342.52,279.53) HDR_B1.15@1342.52,338.58
IO5: HDR_B1.17 U4.AE7 | length 957.4
  Top Layer w5: U4.AE7@1267.72,1019.68 1247.64,999.61 1247.64,831.64 1129.92,713.92 1129.92,685.04 1141.73,673.23 1141.73,543.31 1374.02,311.02 v2(1374.02,279.53)
  Bottom Layer w7.87: v2(1374.02,279.53) HDR_B1.17@1374.02,338.58
IO6: HDR_B1.19 U4.AA7 | length 1687.6
  Top Layer w5: v1(1248.03,1157.48) U4.AA7@1267.72,1177.17
  MidLayer1 w5: v1@1248.03,1157.09 v1(1248.03,1157.48) 1227.97,1177.54 1158.36,1177.54 1149.3,1168.48 1149.3,1148.9 1138.2,1137.81 1025.52,1137.81 1000.71,1113 903.41,1113 886.58,1096.18 886.58,794.42 1124.16,556.84 1386.71,556.84 1405.51,538.04 v2(1405.51,279.53)
  Bottom Layer w7.87: v2(1405.51,279.53) HDR_B1.19@1405.51,338.58
IO7: HDR_B1.21 U4.AC2 | length 1381.6
  Top Layer w5: v1(956.45,1054.85) 979.04,1077.44 1053.19,1077.44 1070.87,1095.12 U4.AC2@1070.87,1098.42
  MidLayer1 w5: v1(956.45,1054.85) 949.56,1054.85 909,1014.29 909,789 1131.07,566.93 1422.07,566.93 1437.01,551.99 v2(1437.01,279.53)
  Bottom Layer w7.87: v2(1437.01,279.53) HDR_B1.21@1437.01,338.58
IO8: HDR_B1.23 U4.AB9 | length 1141.9
  Top Layer w5: v1(1290.94,722.05) 1277.17,722.05 1228.35,673.23 1228.35,551.18 1468.5,311.02 v2(1468.5,279.53) ; v1(1326.77,1118.11) U4.AB9@1346.46,1137.8
  MidLayer3 w5: v1@1292.43,723.53 v1(1290.94,722.05) 1312.6,743.7 1312.6,762 1357.85,807.26 1357.85,998.6 1386.02,1026.77 1386.02,1088.78 1376.38,1098.43 1344.88,1098.43 v1@1326.77,1116.54
  Bottom Layer w7.87: v2(1468.5,279.53) HDR_B1.23@1468.5,338.58
IO9: HDR_B1.25 U4.AC9 | length 1012.3
  Top Layer w5: v1(1326.77,1078.74) U4.AC9@1346.46,1098.42 ; v1(1337.21,888.98) 1313,864.78 1313,720.47 1313,716.79 1280.71,684.5 1280.71,672.05 1280.71,530.32 1500,311.02 v2(1500,279.53)
  MidLayer3 w5: v1(1326.77,1078.74) 1346.46,1059.05 1346.46,898.23 v1(1337.21,888.98)
  Bottom Layer w7.87: v2(1500,279.53) HDR_B1.25@1500,338.58
IO10: HDR_B1.27 U4.AA10 | length 1436.4
  Top Layer w5: v1(1366.14,1157.48) U4.AA10@1385.83,1177.17
  MidLayer2 w5: v1(1366.14,1157.48) 1385.83,1137.8 1385.83,906.94 1478.01,814.75 1572.43,814.75 1616.71,770.47 1699.53,770.47 1714,756 1791.68,756 1832.68,715 1832.68,683.86 1837.8,678.74 1837.8,585.82 v2(1531.5,279.53)
  Bottom Layer w7.87: v2(1531.5,279.53) HDR_B1.27@1531.5,338.58
IO11: HDR_B1.29 U4.AE10 | length 954.6
  Top Layer w5: U4.AE10@1385.83,1019.68 1368,1001.86 1368,949 1371.7,945.3 1371.7,767.72 1371.7,759.35 1340.43,728.09 1340.18,728.09 1290.71,678.62 1290.71,678.36 1290.71,583.31 1330.71,543.31 1562.99,311.02 v2(1562.99,279.53)
  Bottom Layer w7.87: v2(1562.99,279.53) HDR_B1.29@1562.99,338.58
IO12: HDR_B1.31 U4.AF10 | length 924.8
  Top Layer w5: U4.AF10@1385.83,980.31 1385,979.49 1385,957 1417.05,924.95 1417.05,812.74 1385,780.7 1385,758.51 1337.35,710.86 1337.09,710.86 1323.21,696.97 1323.21,680.73 1330.71,673.23 1330.71,574.8 1354.33,551.18 1594.49,311.02 v2(1594.49,279.53)
  Bottom Layer w7.87: v2(1594.49,279.53) HDR_B1.31@1594.49,338.58
IO13: HDR_B1.33 U4.AC11 | length 1096
  Top Layer w5: v1(1403.94,732.28) 1381.89,732.28 1361.83,712.22 1361.83,681.1 1361.83,680.98 1354.33,673.48 1354.33,582.68 1393.7,543.31 1625.99,311.02 v2(1625.99,279.53) ; v1(1405.51,1078.74) U4.AC11@1425.2,1098.42
  MidLayer3 w5: v1(1403.94,732.28) 1385.37,748.24 1385.37,784.37 1401,800 1415,800 1452,837 1452,999.2 1425.2,1026 1425.2,1033.2 1426,1034 ; v1(1405.51,1078.74) 1405.51,1067.72 1425.2,1048.03 1425.2,1034
  Bottom Layer w7.87: v2(1625.99,279.53) HDR_B1.33@1625.99,338.58
IO14: HDR_B1.35 U4.AC12 | length 1062.5
  Top Layer w5: v1(1406,773) 1429.13,744.09 1429.13,730.17 1411.56,712.6 1401.83,712.6 1386.2,696.97 1386.2,680.48 1393.7,672.98 1393.7,574.8 1417.32,551.18 1657.48,311.02 v2(1657.48,279.53) ; v1(1444.88,1078.74) U4.AC12@1464.57,1098.42
  MidLayer3 w5: v1(1406,773) 1464.57,831.57 1464.57,1049.61 1444.88,1069.29 v1(1444.88,1078.74)
  Bottom Layer w7.87: v2(1657.48,279.53) HDR_B1.35@1657.48,338.58
IO15: HDR_B1.37 U4.AE12 | length 940.5
  Top Layer w5: U4.AE12@1464.92,1019.37 1445.35,999.8 1445.35,969.61 1456.69,958.27 1456.69,764.17 1440.15,747.63 1440.15,723.61 1425.2,708.66 1425.2,681.1 1417.32,673.23 1417.32,582.68 1456.69,543.31 1688.98,311.02 v2(1688.98,279.53)
  Bottom Layer w7.87: v2(1688.98,279.53) HDR_B1.37@1688.98,338.58
IO16: HDR_B1.39 U4.W13 | length 1141.4
  Top Layer w5: v1(1484.25,1236.22) U4.W13@1503.94,1255.91
  MidLayer1 w5: v1(1484.25,1236.22) 1484.25,1235.04 1505.94,1213.36 1520.87,1198.43 1520.87,891.95 1688.58,724.23 1688.58,311.42 v2(1720.47,279.53)
  Bottom Layer w7.87: v2(1720.47,279.53) HDR_B1.39@1720.47,338.58
IO17: HDR_B1.41 U4.AE13 | length 956.4
  Top Layer w5: 1483.98,998.39 1483.98,760.9 1490.16,754.72 1490.16,728.2 1470.24,708.29 1460.51,708.29 1449.19,696.97 1449.19,680.73 1456.69,673.23 1456.69,606.3 1519.68,543.31 1751.97,311.02 v2(1751.97,279.53) ; 1484.49,999.17 U4.AE13@1504.17,1018.86
  Bottom Layer w7.87: v2(1751.97,279.53) HDR_B1.41@1751.97,338.58
IO18: HDR_B1.43 U4.AE14 | length 1020.3
  Top Layer w5: U4.AE14@1543.31,1019.68 1523.23,999.61 1523.23,836.76 1574.82,785.16 1574.82,769.17 1563.51,757.85 1517.95,757.85 1500.27,740.18 1500.27,692.93 1480.31,672.98 1480.31,602.36 1783.47,299.21 v2(1783.47,279.53)
  Bottom Layer w7.87: v2(1783.47,279.53) HDR_B1.43@1783.47,338.58
IO19: HDR_B1.45 U4.AF14 | length 936.5
  Top Layer w5: U4.AF14@1543.31,980.31 1543.31,940.94 1543.31,830.82 1572.89,801.24 1584.82,789.31 1584.82,765.02 1548.14,728.35 1543.31,728.35 1527.56,712.6 1512.18,697.22 1512.18,680.48 1519.31,673.35 1519.31,594.86 1814.96,299.21 v2(1814.96,279.53)
  MidLayer2 w5: v2@1814.57,278.35 v2@1815.35,279.13
  Bottom Layer w7.87: v2(1814.96,279.53) HDR_B1.45@1814.96,338.58
IO20: HDR_B1.47 U4.AB15 | length 1215.8
  Top Layer w5: U4.AB15@1582.68,1137.8 v1(1602.36,1118.11) ; v1(1616.54,919.29) 1616.54,768.06 1553.54,705.07 1553.54,683.46 1540.94,670.87 1540.94,616.54 1661.58,495.9 1835.04,322.44 1835.04,255.12 v2(1814.17,234.25)
  MidLayer3 w5: v1@1602.36,1117.32 1622.05,1097.64 1622.05,1051.18 1640.16,1033.07 1640.16,942.91 v1(1616.54,919.29)
  Bottom Layer w7.87: v2(1814.17,234.25) 1846.46,266.54 HDR_B1.47@1846.46,338.58
IO21: HDR_B1.49 U4.V15 | length 1394.9
  Top Layer w5: U4.V15@1582.68,1295.28 v1(1602.36,1275.59)
  MidLayer2 w5: v1(1602.36,1275.59) 1602.36,1263.78 1622.05,1244.1 1622.05,1045.99 1950.79,717.25 1950.79,683.07 1964.57,669.29 1964.57,649.21 1932.76,617.4 1932.76,278.82 1887.8,233.86 v2(1857.48,233.86)
  Bottom Layer w7.87: v2(1857.48,233.86) 1867.72,244.09 1867.72,289.76 1877.95,300 HDR_B1.49@1877.95,338.58
IO22: HDR_B1.51 U4.U15 | length 1309.7
  Top Layer w5: U4.U15@1583.09,1334.08 1583.24,1334.08 v1(1602.36,1314.96)
  MidLayer2 w5: v1(1602.36,1314.96) 1600,1314.96 1582.48,1297.44 1582.48,993 1594.48,981 1653,981 1888.2,745.8 1888.2,682.67 1900,670.87 1900,288.98 v2(1889.76,279.53)
  Bottom Layer w7.87: v2(1889.76,279.53) 1909.45,299.21 HDR_B1.51@1909.45,338.58
IO23: HDR_B1.53 U4.AF18 | length 1015.2
  Top Layer w5: U4.AF18@1700.79,980.31 1700.79,938.74 1713.78,925.74 1713.78,794.49 1746.21,762.06 1746.21,683.85 1775.34,654.72 1775.34,407.73 1856.51,326.56 1856.51,268.69 1894.88,230.32 v2(1894.88,201.57)
  Bottom Layer w7.87: v2(1894.88,201.57) 1894.88,233.86 1940.95,279.92 HDR_B1.53@1940.95,338.58
IO24: HDR_B1.55 U4.Y17 | length 1182.4
  Top Layer w5: U4.Y17@1661.42,1216.54 v1(1681.1,1196.85)
  MidLayer2 w5: v1(1681.1,1196.85) 1700.79,1177.16 1700.79,1003.21 1973.68,730.32 1988.98,730.32 2009.45,709.84 2009.45,687.4 2031.1,665.75 2031.1,627.56 1972.44,568.9 v2(1972.44,279.53)
  Bottom Layer w7.87: v2(1972.44,279.53) HDR_B1.55@1972.44,338.58
IO25: HDR_B1.57 U4.U18 | length 1517.3
  Top Layer w5: U4.U18@1700.79,1334.65 v1(1720.47,1314.96)
  MidLayer2 w5: v1(1720.47,1314.96) 1740.53,1335.02 1771.69,1335.02 1779.15,1327.56 1779.15,1147.26 1769.68,1137.8 1750.01,1137.8 1744.76,1132.55 ; 1744.76,1132.55 1740.16,1127.95 1740.16,981.1 1972.44,748.82 2007.09,748.82 2057.48,698.43 2057.48,683.46 2046.06,672.05 2046.06,621.26 1992.52,567.72 1992.52,261.42 1969.88,238.78 v2@1969.29,238.19
  Bottom Layer w7.87: v2(1970.08,238.58) 2003.94,272.44 HDR_B1.57@2003.94,338.58
IO26: HDR_B1.59 U4.AD19 | length 1026
  Top Layer w5: U4.AD19@1740.16,1059.05 v1(1759.84,1039.37)
  MidLayer2 w5: v1(1759.84,1039.37) 1759.84,977.95 1975.59,762.2 2012.6,762.2 2074.8,700 2074.8,685.04 2088.58,671.26 2088.58,615.35 2035.04,561.81 v2@2035.04,280.32
  Bottom Layer w7.87: v2(2035.43,279.53) HDR_B1.59@2035.43,338.58
IO27: HDR_B1.61 U4.Y20 | length 1221.1
  Top Layer w5: U4.Y20@1779.53,1216.54 v1(1799.21,1196.85)
  MidLayer2 w5: v1@1798.42,1196.85 v1(1799.21,1196.85) 1799.21,1109.84 1779.53,1090.16 1779.53,1016.14 1825.59,970.08 1850,970.08 1889.08,931 1940,931 2118.56,752.44 2118.56,681.55 2107.87,670.87 2107.87,604.33 2098.99,595.45 2064.57,561.02 2064.57,281.89 v2(2066.93,279.53)
  Bottom Layer w7.87: v2(2066.93,279.53) HDR_B1.61@2066.93,338.58
IO28: HDR_B1.63 U4.W20 | length 1391.3
  Top Layer w5: U4.W20@1779.53,1255.91 v1(1799.21,1236.22)
  MidLayer2 w5: v1@1798.82,1236.22 v1(1799.21,1236.22) 1799.21,1235.43 1818.9,1215.75 1818.9,993.31 1831.89,980.32 1923.62,980.32 2135.43,768.5 2135.43,687.4 2151.18,671.65 2151.18,621.26 2141.36,611.44 2099.21,569.29 2099.21,263.39 v2(2066.14,230.32)
  Bottom Layer w7.87: v2(2066.14,230.32) 2098.43,262.6 2098.43,280.32 ; 2098.43,279.53 HDR_B1.63@2098.43,338.58
IO29: HDR_B1.65 U4.AD21 | length 1162.9
  Top Layer w5: U4.AD21@1818.9,1059.05 v1(1838.58,1039.37)
  MidLayer2 w5: v1(1838.58,1039.37) 1838.58,1030.71 1871.71,997.58 1924.9,997.58 1938.48,984 ; 1938.37,983.89 1943.17,979.08 1964.06,979.08 1992.6,1007.62 2075.26,1007.62 2145.12,937.75 2145.12,862.97 2186.22,821.87 2186.22,686.22 2171.34,671.34 2171.34,320.94 v2(2129.92,279.53)
  Bottom Layer w7.87: v2(2129.92,279.53) HDR_B1.65@2129.92,338.58
IO30: HDR_B1.67 U4.Y21 | length 1328.2
  Top Layer w5: U4.Y21@1818.9,1216.54 v1(1838.58,1196.85)
  MidLayer2 w5: v1(1838.58,1196.85) 1858.27,1177.17 1858.27,1029.13 1867.72,1019.68 2080.9,1019.68 2225.81,874.78 2225.81,738 2199.24,711.43 2199.24,686.59 2213.78,672.05 2213.78,331.89 v2(2161.42,279.53)
  Bottom Layer w7.87: v2(2161.42,279.53) HDR_B1.67@2161.42,338.58
IO31: HDR_B1.69 U4.AE23 | length 937.6
  Top Layer w5: U4.AE23@1897.64,1019.68 1896.89,1019.68 1878.7,1001.5 1878.7,955.94 1892.35,942.3 1902.66,931.99 1902.66,750.34 1947,706 1947,687 1965,669 1965,507.44 v2(2192.91,279.53)
  Bottom Layer w7.87: v2(2192.91,279.53) HDR_B1.69@2192.91,338.58
IO32: HDR_B1.71 U4.AC23 | length 1103.9
  Top Layer w5: U4.AC23@1897.64,1098.42 v1(1917.32,1078.74)
  MidLayer2 w5: v1(1917.32,1078.74) 1937.01,1059.06 1964.96,1059.06 1981.1,1042.91 2077.17,1042.91 2246.06,874.02 2246.06,683.07 2224.41,661.42 v2(2224.41,279.53)
  Bottom Layer w7.87: v2(2224.41,279.53) HDR_B1.71@2224.41,338.58
IO33: HDR_B1.73 U4.AB23 | length 1323.8
  Top Layer w5: U4.AB23@1897.64,1137.8 v1(1917.32,1118.11)
  MidLayer2 w5: v1(1917.32,1118.11) 1937.01,1098.43 2040.11,1098.43 2042.78,1101.1 2122.1,1101.1 2322.83,900.36 2322.83,688.98 2341.73,670.08 2341.73,635.83 2307.87,601.97 2307.87,258.66 v2(2291.34,242.13)
  Bottom Layer w7.87: HDR_B1.73@2255.91,338.58 2255.91,277.56 v2(2291.34,242.13)
IO34: HDR_B1.75 U4.AC24 | length 1099.6
  Top Layer w5: U4.AC24@1937.01,1098.42 v1(1956.69,1078.74)
  MidLayer2 w5: v1(1956.69,1078.74) 1966.54,1078.74 1992.13,1053.15 2084.25,1053.15 2309.06,828.35 2309.06,683.07 2288.19,662.21 v2(2288.19,280.31)
  Bottom Layer w7.87: v2@2287.4,279.53 2287.4,280.31 HDR_B1.75@2287.4,338.58
IO35: HDR_B1.77 U4.AF25 | length 912.1
  Top Layer w5: U4.AF25@1976.38,980.31 1976.38,929.53 2131.1,774.8 2131.1,691.73 2318.9,503.93 2318.9,288.97 v2(2329.13,278.74)
  Bottom Layer w7.87: HDR_B1.77@2318.9,338.58 2318.9,288.97 v2(2329.13,278.74) ; v2@2330.51,280.12 v2@2330.71,279.92
KBCLOCK: HDR_T1.26 U4.E15 | length 1201.8
  Top Layer w5: v1(1563.78,1827.56) 1582.68,1808.66 U4.E15@1582.68,1807.09
  MidLayer4 w5: 1383.27,2242.32 1582.68,2042.91 1582.68,1846.46 v1(1563.78,1827.56) ; 1383.46,2242.52 1383.46,2260.63 1394.88,2272.04 1394.88,2353.93 1401.97,2361.02 1401.97,2668.5 ; 1401.97,2668.9 1401.97,2668.5 ; v1(1467.72,2734.25) 1401.97,2668.5
  Bottom Layer w5: v1(1467.72,2734.25) 1500,2701.97 HDR_T1.26@1500,2606.3
KBDATA: HDR_T1.28 U4.F15 | length 1465.6
  Top Layer w5: U4.F15@1582.68,1767.72 v1(1602.36,1787.4)
  MidLayer4 w5: v1(1482.28,2781.1) 1366.2,2665.02 1366.2,2397.7 1290.16,2321.65 1290.16,2272.83 1329.13,2233.86 1366.54,2233.86 1535.23,2065.16 1542.91,2057.48 1542.91,1819.29 1555.12,1807.09 1583.86,1807.09 1602.36,1788.58 v1(1602.36,1787.4)
  Bottom Layer w5: v1(1482.28,2781.1) 1530.71,2732.68 1530.71,2606.3 HDR_T1.28@1530.71,2604.72
LED0: HDR_B1.6 U4.AB7 | length 565.7
  Top Layer w5: v1(1248.03,1118.11) U4.AB7@1267.72,1137.8
  MidLayer1 w5: v2(1185.04,665.35) 1192.61,672.92 1192.61,977.74 1228.35,1013.47 1228.35,1098.43 v1(1248.03,1118.11)
  Bottom Layer w7.87: HDR_B1.6@1185.04,606.3 v2(1185.04,665.35)
LED1: HDR_B1.8 U4.AD7 | length 481.5
  Top Layer w5: v1(1248.03,1039.37) U4.AD7@1267.72,1059.05
  MidLayer1 w5: v2(1216.54,688.98) 1207.45,698.06 1207.45,964.82 1247.64,1005 1247.64,1038.98 v1(1248.03,1039.37)
  Bottom Layer w7.87: HDR_B1.8@1216.54,606.3 v2(1216.54,688.98)
LED2: HDR_B1.10 U4.AE8 | length 454.4
  Top Layer w5: v1(1269.29,913.78) 1288.54,933.03 1288.54,999.69 1306.42,1017.56 1307.09,1017.56 U4.AE8@1307.2,1017.56
  MidLayer1 w5: v2(1248.03,665.35) 1248.03,695.67 1231.41,712.29 1231.41,883.41 1261.78,913.78 v1(1269.29,913.78)
  Bottom Layer w7.87: HDR_B1.10@1248.03,606.3 v2(1248.03,665.35)
LED3: HDR_B1.12 U4.AF8 | length 407.6
  Top Layer w5: v1(1251,750) 1263.46,762.46 1263.46,879.7 1292.98,909.22 ; 1293.1,909.1 1308.74,924.74 U4.AF8@1308.74,978.15
  Bottom Layer w7.87: v1(1251,750) 1251,710 1273,688 1279.53,681.43 HDR_B1.12@1279.53,606.3
LED4: HDR_B1.14 U4.Y10 | length 702.6
  Top Layer w5: v1(1366.14,1196.85) U4.Y10@1385.83,1216.54
  MidLayer1 w5: v2(1311.02,665.35) 1312.6,666.93 1312.6,1020.8 1307.09,1026.31 1307.09,1207.48 1309.42,1209.81 1315.77,1216.16 1346.83,1216.16 v1(1366.14,1196.85)
  Bottom Layer w7.87: HDR_B1.14@1311.02,606.3 v2(1311.02,665.35)
LED5: HDR_B1.16 U4.V11 | length 801.6
  Top Layer w5: U4.V11@1425.2,1295.28 1425.98,1295.28 v1(1444.88,1314.17)
  MidLayer1 w5: v2(1342.52,688.98) 1360,706.46 1360,1007.62 1346.83,1020.79 1346.83,1169.66 1354.33,1177.17 1376.38,1177.17 1385.45,1186.24 1385.45,1254.74 1395.91,1265.2 v1(1444.88,1314.17)
  Bottom Layer w7.87: HDR_B1.16@1342.52,606.3 v2(1342.52,688.98)
LED6: HDR_B1.18 U4.V12 | length 736.6
  Top Layer w5: v1(1444.88,1275.59) U4.V12@1464.57,1295.28
  MidLayer1 w5: v2(1374.02,665.35) 1374.02,1010.94 1385.45,1022.38 1385.45,1165.77 1396.47,1176.79 1413.78,1176.79 1425.57,1188.58 1425.57,1256.28 v1(1444.88,1275.59)
  Bottom Layer w7.87: HDR_B1.18@1374.02,606.3 v2(1374.02,665.35)
LED7: HDR_B1.20 U4.Y12 | length 657.4
  Top Layer w5: v1(1444.88,1196.85) U4.Y12@1464.57,1216.54
  MidLayer1 w5: v2(1405.51,688.98) 1405.51,689.51 1429,713 1429,746.99 1453,771.02 1453,997.57 1425.57,1025 1425.57,1166.51 1444.88,1185.83 v1(1444.88,1196.85)
  Bottom Layer w7.87: HDR_B1.20@1405.51,606.3 v2(1405.51,688.98)
LED_PGM: LED1.2 U2.4 | length 220.7
  Top Layer w7.87: LED1.2@1295.28,165.35 1301.18,165.35 1425.2,165.35 v1(1468.5,122.05)
  Bottom Layer w7.87: U2.4@1438.97,122.05 v1(1468.5,122.05)
LED_PWR: LED2.1 R2.2 | length 102.8
  Top Layer w15.75: v1(1893.7,169.29) LED2.1@1935.04,169.29 LED2.1@1937.01,169.29
  Bottom Layer w15.75: v1(1893.7,169.29) R2.2@1953.23,169.29
LX: L1.1 U6.1 U6.3 U6.14 U6.16 | length 321.6
  Top Layer w15.75: U6.16@2592.58,1633.25 2660.81,1633.25 2665.36,1637.8 v3@2669.29,1641.73 ; U6.14@2592.58,1683.25 2651.4,1683.25 ; 2653.54,1681.1 2651.4,1683.25 ; v3@2669.29,1677.16 2663.21,1683.25 2661.42,1683.25 2651.4,1683.25 ; 2748.03,1641.73 2756.52,1633.25 U6.1@2824.58,1633.25 ; 2748.03,1677.17 2754.11,1683.25 U6.3@2824.58,1683.25
  other v3: 2661.42,1641.73 2690.96,1641.73 2720.5,1641.73 2661.42,1669.29 2690.96,1669.29 2720.5,1669.29 2661.42,1696.85 2690.96,1696.85 2720.5,1696.85
MOUSECLOCK: HDR_T1.30 U4.E17 | length 1085.8
  Top Layer w5: U4.E17@1661.42,1807.09 v1(1681.1,1826.77)
  MidLayer4 w5: v2(1562.99,2665.35) 1522.83,2625.2 1522.83,2274.8 1511.02,2262.99 1511.02,2182.68 1666.93,2026.77 1666.93,1977.56 1653.94,1964.57 1631.89,1964.57 1622.05,1954.72 1622.05,1857.48 1633.07,1846.46 1664.17,1846.46 1681.1,1829.53 v1(1681.1,1826.77)
  Bottom Layer w7.87: HDR_T1.30@1562.99,2606.3 v2(1562.99,2665.35)
MOUSEDATA: HDR_T1.32 U4.C17 | length 990.2
  Top Layer w5: U4.C17@1661.42,1885.83 v1(1681.1,1905.51)
  MidLayer4 w5: v2@1594.49,2690.94 v2(1594.49,2688.98) 1594.49,2660.63 1542.52,2608.66 1542.52,2272.44 1555.91,2259.06 1555.91,2160.24 1679.92,2036.22 1679.92,1972.44 1661.42,1953.94 1661.42,1925.2 v1(1681.1,1905.51)
  Bottom Layer w7.87: HDR_T1.32@1594.49,2606.3 v2(1594.49,2688.98)
NetC120_1: C120.1 U7.6 | length 96.1
  Top Layer w5: U7.6@1940.94,2496.06 1972.44,2496.06 1996.06,2519.68 1996.06,2538.38 1991.14,2543.3 C120.1@1987.2,2547.24
NetLED1_1: LED1.1 R1.2 | length 87.1
  Top Layer w7.87: v1(1181.1,169.29) LED1.1@1222.44,169.29
  Bottom Layer w7.87: v1(1181.1,169.29) R1.2@1226.85,169.29
NetR9_1: R9.1 U5.4 | length 74.9
  Bottom Layer w5: R9.1@736.03,2769.44 759.18,2769.44 766.54,2762.09 U5.4@807.86,2762.09
NetR21_2: R21.2 R22.1 | length 60
  Top Layer w13.78: R21.2@2910.94,1866.14 R22.1@2970.94,1866.14
NetRN1_8: RN1.8 RN4.5 | length 91.3
  Bottom Layer w5: RN1.8@1688.58,3271.65 RN4.5@1779.53,3271.65 RN4.5@1779.92,3271.65
NetRN2_8: RN2.8 RN6.5 | length 91.3
  Bottom Layer w5: RN2.8@1393.3,3271.65 RN6.5@1483.28,3271.65 RN6.5@1484.64,3271.65
NEXUS_TCK: HDR_T1.82 U4.A14 | length 2624.1
  Top Layer w5: U4.A14@1543.31,1964.57 v1(1562.99,1984.25)
  MidLayer3 w5: v1(1562.99,1984.25) 1582.68,1964.57 1582.68,1917.32 1543.31,1877.95 1543.31,1506.16 1568.52,1480.94 1881.26,1480.94 1897.22,1464.98 1897.22,1426.65 1908.54,1415.33 1924.53,1415.33 1935.85,1426.65 1935.85,1441.11 1959.72,1464.98 2150.02,1464.98 2287.4,1602.36 2287.4,2059.11 2433.07,2204.78 2433.07,2263.78 2425.2,2271.65 2425.2,2381.89 2381.89,2425.2 v2(2381.89,2665.35)
  Bottom Layer w7.87: HDR_T1.82@2381.89,2606.3 v2(2381.89,2665.35)
NEXUS_TDI: HDR_T1.84 U4.R18 | length 1969.7
  Top Layer w5: U4.R18@1700.79,1413.39 v1(1720.47,1393.7)
  MidLayer3 w5: v1(1720.47,1393.7) 1737.35,1376.82 1740.18,1374 1748.41,1374 ; 1748.42,1374.01 1758.66,1374.02 1884.25,1374.02 1910.24,1400 1950,1400 2001.97,1451.97 2151.15,1451.97 2299.21,1600.03 2299.21,2056.04 2444.88,2201.71 2444.88,2251.97 2464.57,2271.65 2464.57,2377.95 2413.38,2429.13 v2(2413.38,2688.98)
  Bottom Layer w7.87: HDR_T1.84@2413.39,2606.3 v2(2413.38,2688.98)
NEXUS_TDO: HDR_T1.76 U4.D24 | length 1093.3
  Top Layer w5: U4.D24@1937.01,1846.46 v1(1956.69,1866.14) ; v1@1957.79,1865.98 v1@1957.79,1866.14 ; v1(2080.71,2214.28) 2074.8,2220.19 2074.8,2259.84 2086.61,2271.65 2287.4,2472.44 v2(2287.4,2688.98)
  MidLayer1 w5: v1(1956.69,1866.14) 1956.76,1866.14 1956.76,1867.01 1937.3,1886.47 1937.3,1917.2 1955.42,1935.33 1955.42,1952.27 2064.52,2061.37 2064.52,2198.08 v1@2080.21,2213.78 ; v1@2080.71,2213.78 v1@2080.46,2214.03 ; v1@2080.21,2213.78 v1@2080.46,2214.03 ; v1@2080.21,2213.78 v1@2080.21,2214.28 ; v1@2080.21,2214.28 v1(2080.71,2214.28) v1@2080.46,2214.03 ; v1@2080.21,2214.28 v1@2080.46,2214.03
  Bottom Layer w7.87: HDR_T1.76@2287.4,2606.3 v2(2287.4,2688.98)
NEXUS_TMS: HDR_T1.80 U4.P23 | length 1707.5
  Top Layer w5: U4.P23@1897.64,1452.76 v1(1916.54,1434.65)
  MidLayer3 w5: v1(1916.54,1434.65) 1916.54,1455.91 1937.52,1476.89 2146.18,1476.89 2275.59,1606.3 2275.59,2062.06 2393.7,2180.17 2393.7,2263.78 2401.57,2271.65 2401.57,2366.14 2350.39,2417.33 v2(2350.39,2688.98)
  Bottom Layer w7.87: HDR_T1.80@2350.4,2606.3 v2(2350.39,2688.98)
NFAULT: R24.2 U7.8 | length 239.6
  Top Layer w5: R24.2@1741.65,2637.79 1741.65,2593.35 1788.75,2546.25 U7.8@1917.32,2546.26
ONE_WIRE.PIO2: U1.6
ONE_WIRE_DB_PB: HDR_B1.79 U4.AC8 | length 1928.8
  Top Layer w5: v1(1287.4,1078.74) U4.AC8@1307.09,1098.42
  MidLayer3 w5: v1(1287.4,1078.74) 1287.4,1066.86 1267.34,1046.8 1267.34,995.76 1247.71,976.13 1247.71,809.71 1215.96,777.96 1215.96,724.99 1238.39,702.55 1255.06,685.88 1267.72,673.23 1267.72,622.05 1350.79,538.98 2107.78,538.98 2357.48,289.28 2357.48,275.47 2357.48,267.72 v2(2383.07,242.13)
  Bottom Layer w5: HDR_B1.79@2351.57,337.01 2351.57,273.62 v2(2383.07,242.13)
ONE_WIRE_DBID: HDR_T1.92 U1.2 | length 314.2
  Bottom Layer w5: HDR_T1.92@2539.37,2606.3 2539.37,2663.36 2546.59,2670.58 2546.59,2812.34 2580.71,2846.46 U1.2@2637.59,2846.45
ONE_WIRE_PIO1: HDR_T1.91 U1.3 | length 1165.6
  MidLayer4 w5: v1(2539.36,2248.03) 2587.39,2200 v1(2615,2200)
  Bottom Layer w5: v1(2539.36,2248.03) HDR_T1.91@2539.36,2318.89 ; v1(2615,2200) 2755.12,2200 2787.4,2232.28 2787.4,2562.4 2811.02,2586.02 2811.02,2716.53 2795.27,2732.28 2732.28,2732.28 2708.66,2755.9 2708.66,2877.95 2690.15,2896.45 U1.3@2637.59,2896.45
PROG_B: R7.2 U4.A2 | length 546.2
  Top Layer w5: v1@661.39,2174.5 v1(658.6,2174.5) 848.61,1984.49 1009.17,1984.49 1009.29,1984.37 1051.02,1984.37 1070.85,1964.55 1071.38,1964.02 U4.A2@1071.65,1964.02
  Bottom Layer w5: v1(658.6,2174.5) 687.58,2145.52 R7.2@689.74,2145.52
REF_1V2: C117.2 U6.10 | length 86.8
  Top Layer w15.75: C117.2@2505.9,1783.46 2506.11,1783.25 U6.10@2592.58,1783.25
REF_CLK: HDR_B1.4 U4.Y14 | length 1141.2
  Top Layer w5: v1(1523.62,736.22) 1525.05,737.65 v1@1524.66,737.65 ; U4.Y14@1543.31,1216.54 v1(1562.99,1196.85)
  MidLayer1 w5: v2(1153.54,688.98) 1153.54,665.35 1177.17,641.73 1511.81,641.73 1551.18,681.1 1551.18,708.66 v1(1523.62,736.22)
  MidLayer2 w5: v1@1562.2,1197.64 1562.6,1198.03 v1@1562.99,1198.03
  MidLayer3 w5: v1(1523.62,736.22) 1541.88,736.22 1574.82,769.17 1574.82,791.32 1543.68,822.46 1543.68,1177.54 v1(1562.99,1196.85)
  Bottom Layer w7.87: HDR_B1.4@1153.54,606.3 v2(1153.54,688.98)
RS232_CTS: HDR_T1.22 U4.A15 | length 859
  Top Layer w5: U4.A15@1582.68,1964.57 v1(1602.36,1984.25)
  MidLayer4 w5: v2(1437.01,2665.35) 1437.01,2361.02 1409.84,2333.86 1409.84,2276.77 1432.28,2254.33 1432.28,2215.36 1602.36,2045.28 v1(1602.36,1984.25)
  Bottom Layer w7.87: HDR_T1.22@1437.01,2606.3 v2(1437.01,2665.35)
RS232_RTS: HDR_T1.18 U4.E12 | length 1536.8
  Top Layer w5: v1(1444.88,1826.77) U4.E12@1464.57,1807.09
  MidLayer4 w5: v1(1391.34,2782.28) 1358.66,2749.61 1241.83,2749.61 1160.24,2668.01 1160.24,2276.77 1179.92,2257.09 1179.92,2225.2 1298.43,2106.69 1425.98,2106.69 1464.57,2068.11 1464.57,1845.67 v1@1446.46,1827.56
  Bottom Layer w5: HDR_T1.18@1374.41,2607.48 1374.41,2765.35 v1(1391.34,2782.28)
RS232_RX: HDR_T1.24 U4.B15 | length 883.6
  Top Layer w5: U4.B15@1582.68,1925.2 v1(1602.36,1944.88)
  MidLayer4 w5: v1(1468.11,2665.75) 1468.11,2283.86 1491.49,2260.48 1491.49,2181.74 1622.05,2051.18 1622.05,1968.9 1602.36,1949.21 v1(1602.36,1944.88)
  Bottom Layer w5: HDR_T1.24@1467.72,2618.5 HDR_T1.24@1467.72,2623.62 ; HDR_T1.24@1468.11,2607.87 v1(1468.11,2665.75)
RS232_TX: HDR_T1.20 U4.G13 | length 1640.3
  Top Layer w5: v1(1484.25,1748.03) U4.G13@1503.94,1728.35
  MidLayer4 w5: v1(1435.04,2782.68) 1385.83,2733.46 1259.06,2733.46 1208.27,2682.68 1208.27,2275.19 1190.94,2257.87 1190.94,2231.5 1229.5,2192.94 1362.6,2192.94 1504.72,2050.82 1504.72,1771.65 1483.86,1750.79 v1@1483.86,1749.61
  Bottom Layer w5: HDR_T1.20@1405.51,2607.48 1405.51,2753.15 v1(1435.04,2782.68)
SCL: HDR_B1.5 U4.W7 | length 1106.8
  Top Layer w5: v1(1248.03,1236.22) U4.W7@1267.72,1255.91
  MidLayer3 w5: v2(1185.04,279.53) 1204.72,299.21 1204.72,673.23 1195.28,682.68 1195.28,952.07 1228.35,985.14 1228.35,1049.26 1237.87,1058.78 1260.5,1058.78 1267.39,1065.67 1267.39,1216.86 v1(1248.03,1236.22)
  Bottom Layer w7.87: v2(1185.04,279.53) HDR_B1.5@1185.04,338.58
SDA: HDR_B1.3 U4.AF4 | length 781
  Top Layer w5: U4.AF4@1149.61,980.31 1149.61,924.67 v1(1170.96,903.31)
  MidLayer3 w5: v2(1153.54,279.53) 1153.54,661.42 1177.17,685.04 1177.17,897.11 v1(1170.96,903.31)
  Bottom Layer w7.87: v2(1153.54,279.53) HDR_B1.3@1153.54,338.58
SLEEP_N: HDR_T1.93 U5.2 | length 2444
  MidLayer3 w5: v1(2526.91,2713.87) 2543.64,2697.14 2543.64,2638.1 2561.35,2620.39 2561.35,2240.57 2540.08,2219.29 v1(2539.37,2219.29)
  Bottom Layer w5: U5.2@922.01,2799.48 1044.02,2799.48 1128.65,2884.1 1563.58,2884.1 1658.04,2978.57 2032.94,2978.57 2161.85,2849.66 2232.7,2849.66 2332.08,2750.28 2490.5,2750.28 v1(2526.91,2713.87) ; v1@2537.8,2215.35 2570.87,2248.43 HDR_T1.93@2570.87,2338.58
SPI_CLK: HDR_T1.46 U4.D13 | length 1033.2
  Top Layer w5: v1(1484.25,1866.14) U4.D13@1503.94,1846.46
  MidLayer2 w5: v1(1484.25,1866.14) 1512.6,1894.49 1512.6,2201.4 1553.14,2241.94 1553.14,2261.83 1540.94,2274.02 1540.94,2391.34 1608.16,2458.56 v2(1814.96,2665.35)
  Bottom Layer w7.87: HDR_T1.46@1814.96,2606.3 v2(1814.96,2665.35)
SPI_DIN: HDR_T1.44 U4.A12 | length 955.5
  Top Layer w5: v1(1444.88,1984.25) U4.A12@1464.57,1964.57
  MidLayer2 w5: v1(1444.88,1984.25) 1444.88,2001.57 1478.16,2034.85 1478.16,2230.13 1519.38,2271.35 1519.38,2424.9 v2(1783.46,2688.98)
  Bottom Layer w7.87: HDR_T1.44@1783.47,2606.3 v2(1783.46,2688.98)
SPI_DOUT: HDR_T1.50 U4.E14 | length 1235.4
  Top Layer w5: U4.E14@1543.31,1807.09 1543.31,1806.3 v1(1562.99,1786.61)
  MidLayer2 w5: v1(1562.99,1786.61) 1537.01,1812.6 1537.01,2173.66 1595.93,2232.57 1795.57,2232.57 1877.95,2314.95 v2(1877.95,2665.35)
  Bottom Layer w7.87: HDR_T1.50@1877.95,2606.3 v2(1877.95,2665.35)